# Altium PCB Power Board.PcbDoc
Units mil, origin at the board's own origin, x right, y up, seen from the top; angles counter-clockwise.
Board outline 3937.01 x 3937.01 mil, 2 copper layers (Top Layer, Bottom Layer); 90 components, 30 nets, 264 pads, 270 vias.
Unrouted connection lines stored in the file: 23.
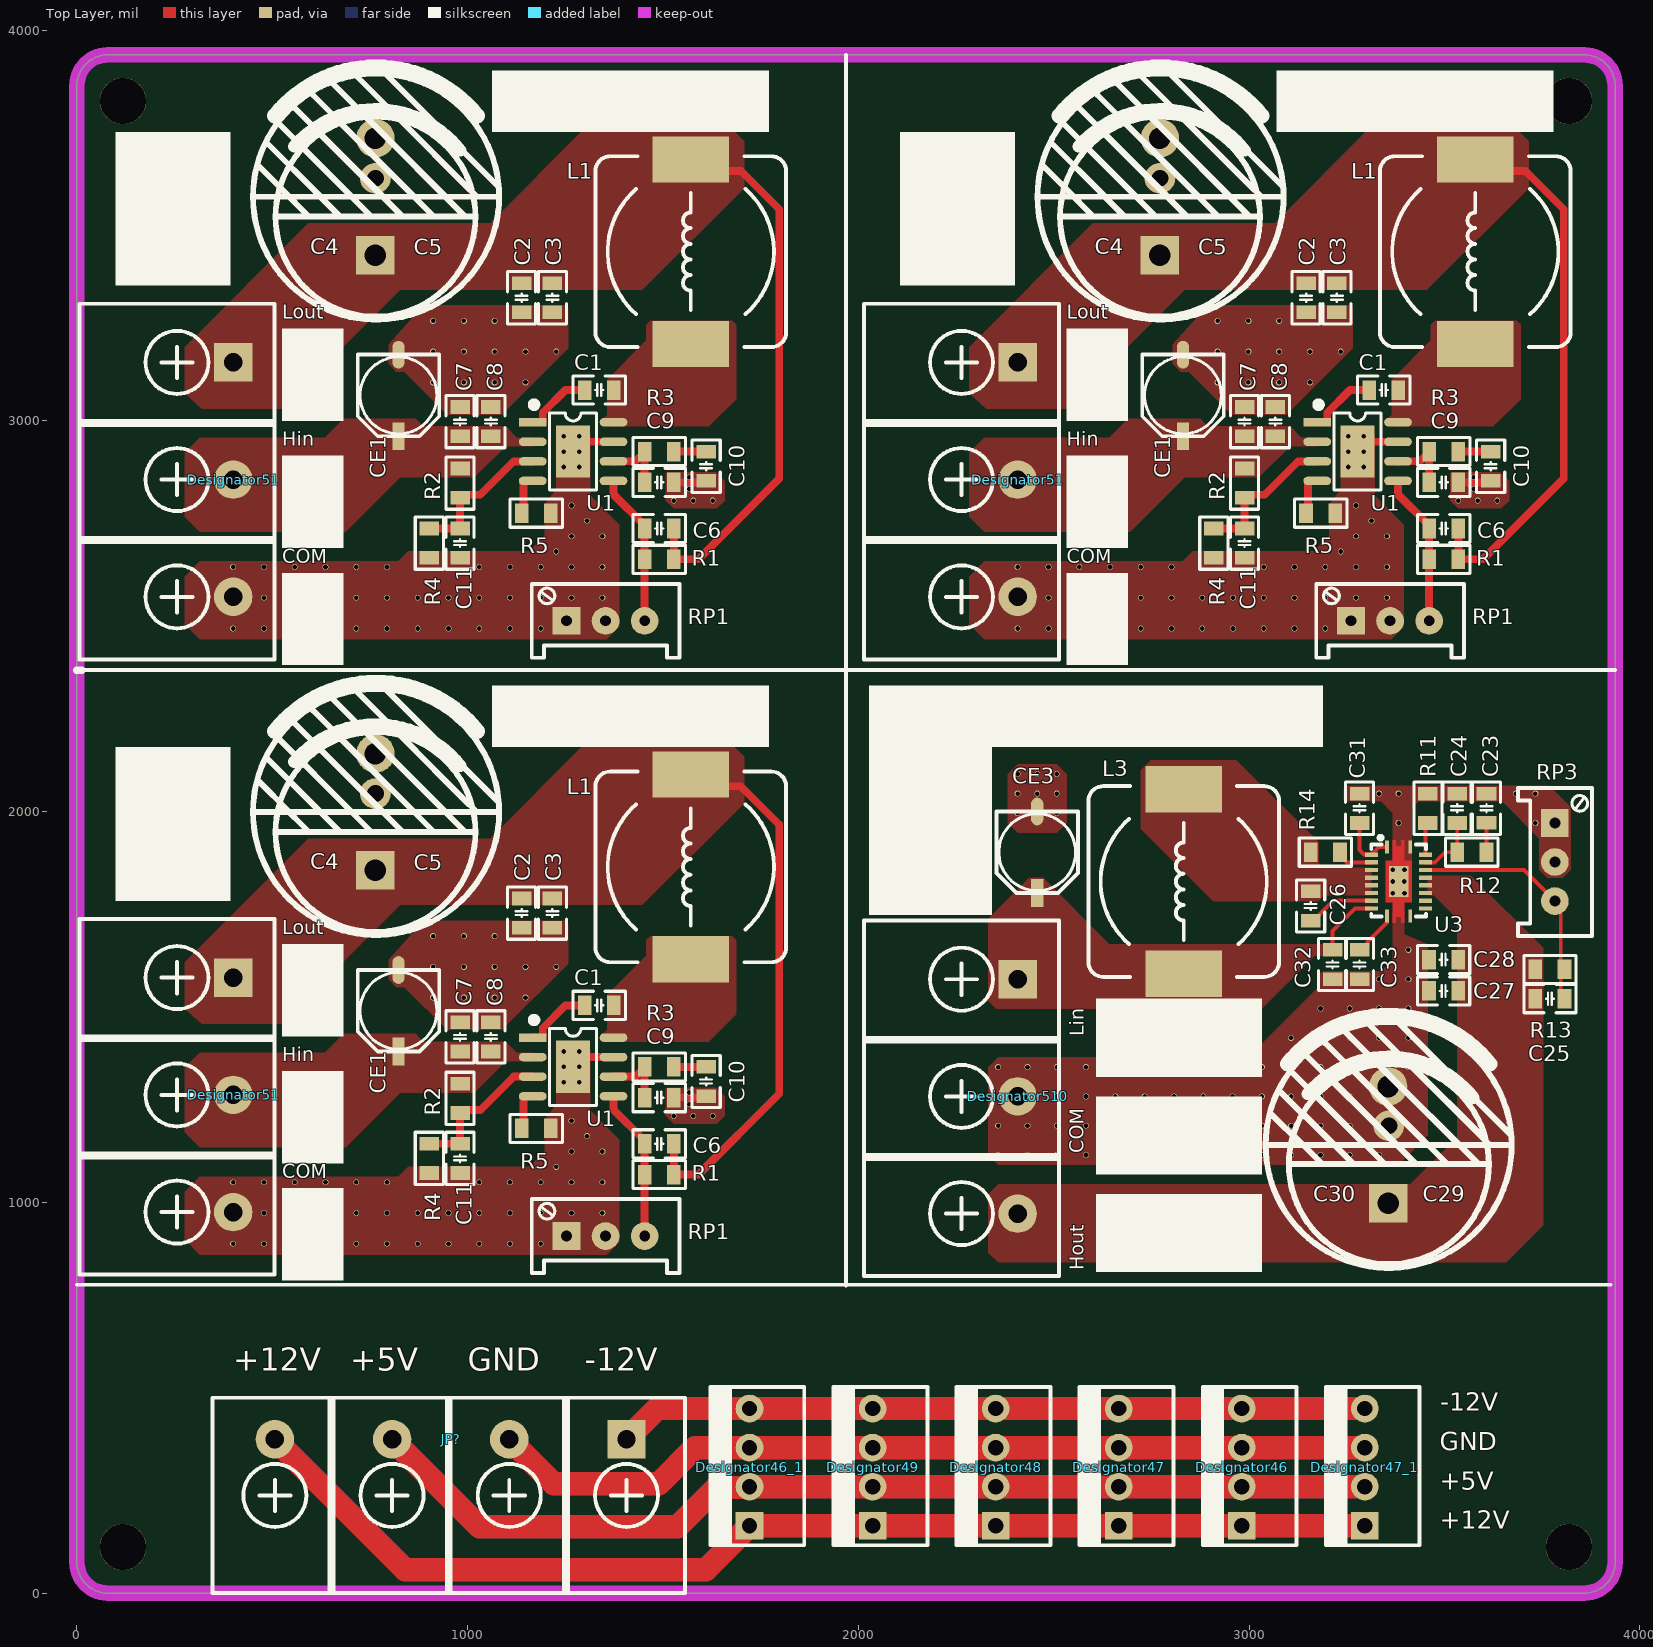
[diagram p0: Top Layer view]
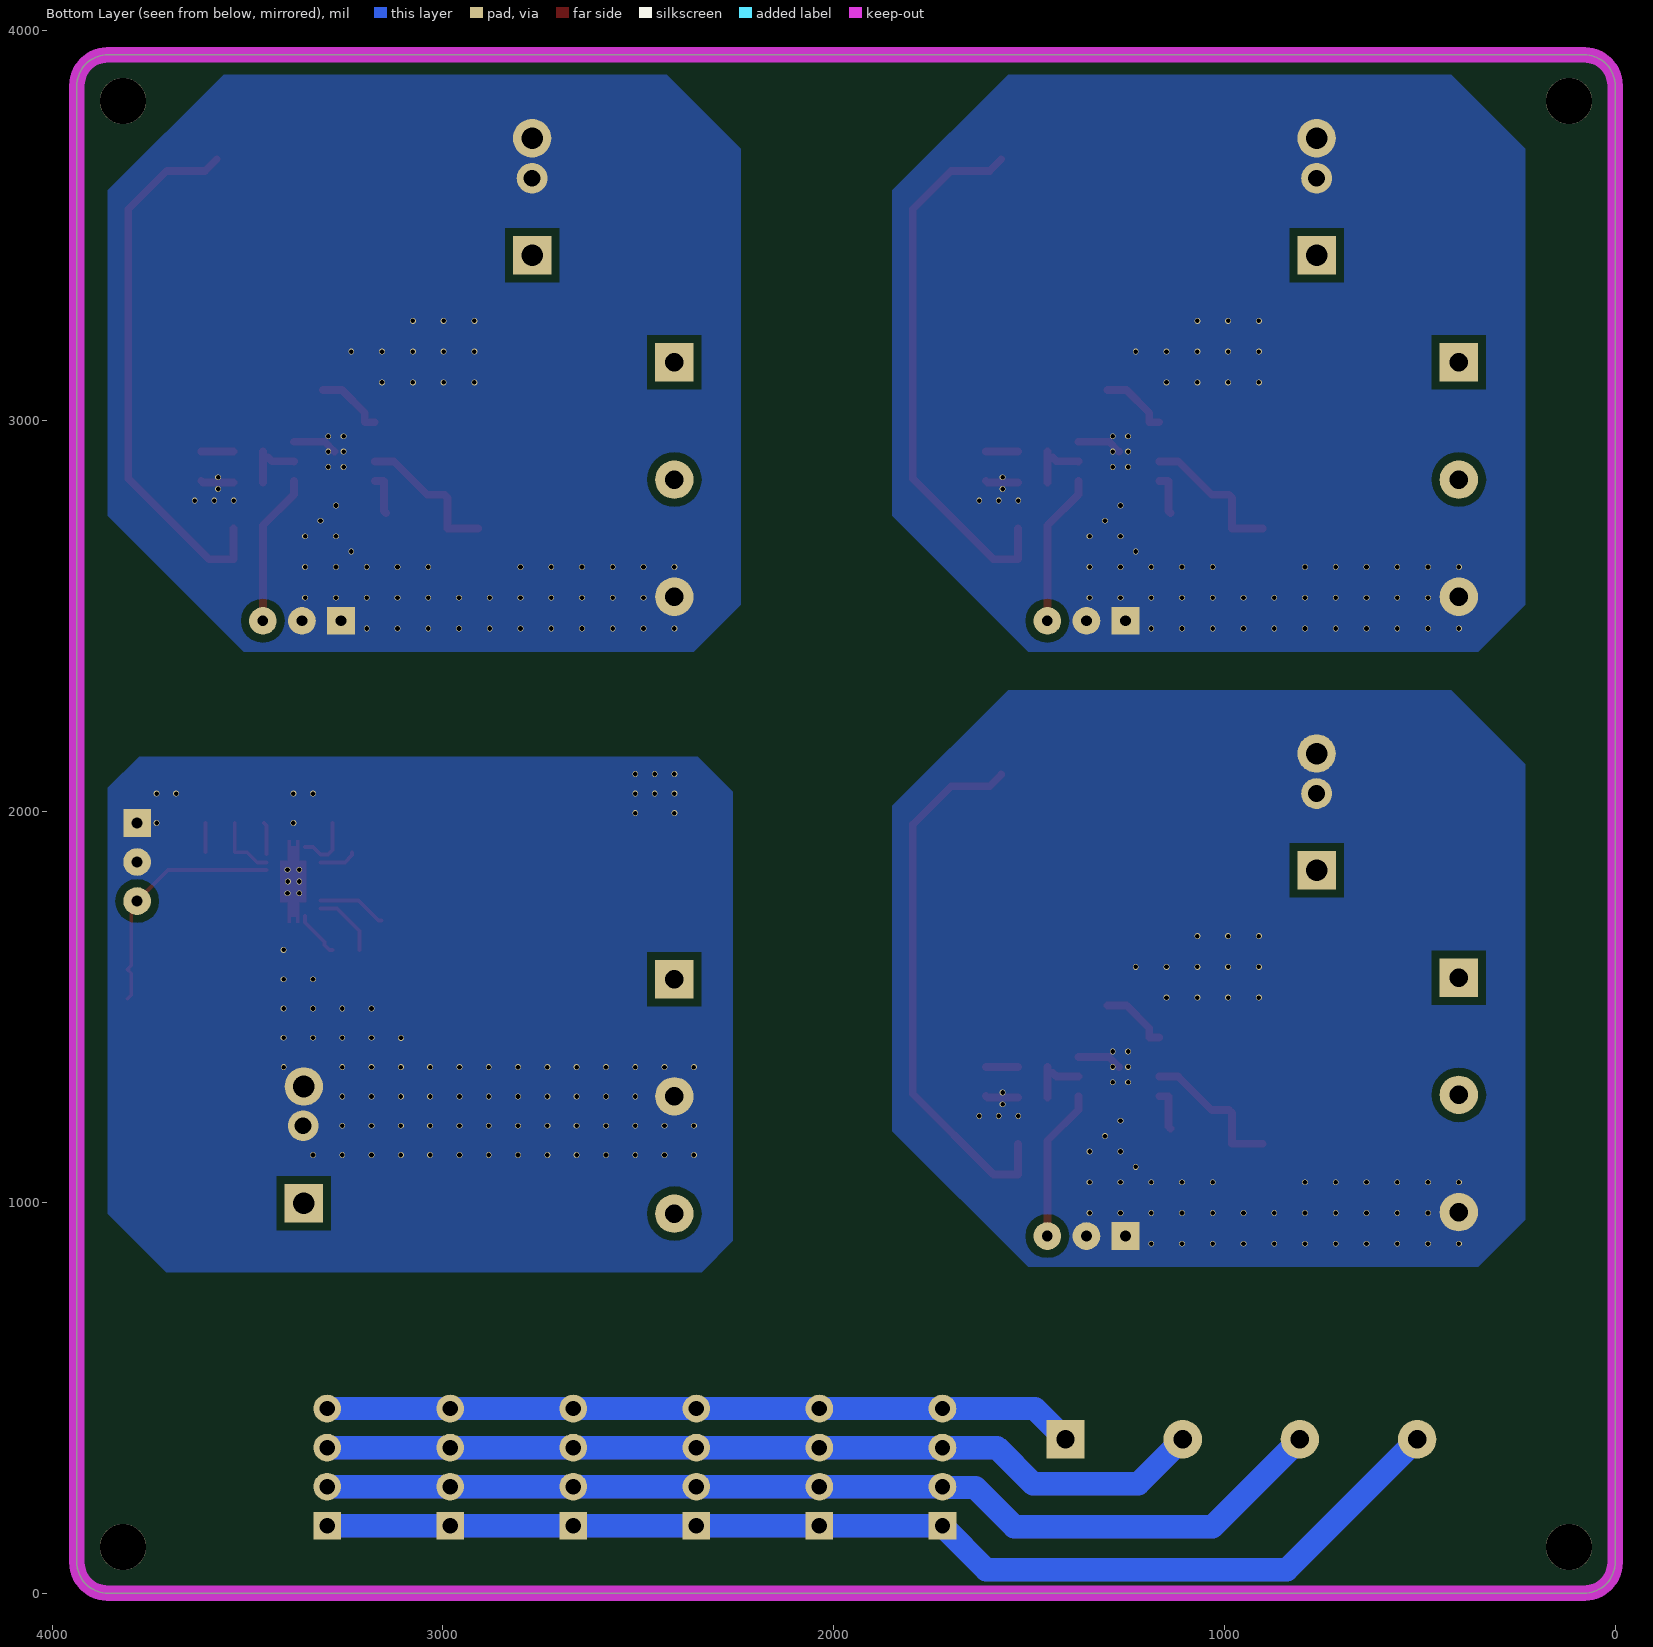
[diagram p1: Bottom Layer view, seen from below]

## Layer stack, top to bottom
Top Solder: solder mask 0.4, Solder Resist, Dk 3.5
Top Layer: signal copper 1.4
Dielectric 1: dielectric 12.6, FR-4, Dk 4.8
Bottom Layer: signal copper 1.4
Bottom Solder: solder mask 0.4, Solder Resist, Dk 3.5

## Board outline
0,78.74 0,3858.27 cw(c78.74,3858.27) 78.74,3937.01 3858.27,3937.01 cw(c3858.27,3858.27) 3937.01,3858.27 3937.01,78.74 cw(c3858.27,78.74) 3858.27,0 78.74,0 cw(c78.74,78.74)

## Design rules (kind name [scope] priority, off if disabled: settings)
Clearance Clearance_1 [OnLayer('Bottom Layer')] p1: gap=20 ignorepadtopadclearanceinfootprint=TRUE except(0: Arc-Hole Track-Hole SMDPad-Hole THPad-Hole Via-Hole Fill-Hole Poly-Hole Region-Hole Text-Hole; 10: Arc-Arc Arc-Track Arc-SMDPad Arc-THPad Arc-Via Arc-Text Track-Track Track-SMDPad Track-THPad Track-Via Track-Text SMDPad-SMDPad SMDPad-THPad SMDPad-Via SMDPad-Text THPad-THPad THPad-Via THPad-Text Via-Via Via-Text Text-Text)
Clearance [All] p2: gap=5 ignorepadtopadclearanceinfootprint=FALSE except(0: Arc-Hole Track-Hole SMDPad-Hole THPad-Hole Via-Hole Fill-Hole Poly-Hole Region-Hole Text-Hole; 10: Arc-Arc Arc-Track Arc-SMDPad Arc-THPad Arc-Via Arc-Text Track-Track Track-SMDPad Track-THPad Track-Via Track-Text SMDPad-SMDPad SMDPad-THPad SMDPad-Via SMDPad-Text THPad-THPad THPad-Via THPad-Text Via-Via Via-Text Text-Text)
PolygonConnect [All] p1: connectstyle=Direct reliefconductorwidth=10 reliefentries=4 polygonreliefangle="90 Angle" airgapwidth=10
RoutingVias [All] p1: holewidth=28 width=50 viastyle="Through Hole" minholewidth=28 minwidth=50 maxholewidth=28 maxwidth=50
SolderMaskExpansion [All] p1: expansion=4 istentingtop=FALSE
Width [All] p1: maxlimit=80 minlimit=10 preferedwidth=10
30 further rules are at their usual default settings.

## Classes and differential pairs
component class "SCT12A0 BOOST": C23 C24 C25 C26 C27 C28 C29 C30 C31 C32 C33 CE3 L3 R11 R12 R13 R14 RP3 U3

## Components (designator, comment, footprint, x,y, rotation, side; value= is the part's Value field where it differs from the comment)
C1 "104" "C 0805_L" 1337.01,1504.33 r0 top
C1 "104" "C 0805_L" 3344.89,3079.14 r0 top
C1 "104" "C 0805_L" 1337.01,3079.14 r0 top
C2 "105" "C 0805_L" 1138.19,1740.55 r90 top
C2 "105" "C 0805_L" 3146.06,3315.35 r90 top
C2 "105" "C 0805_L" 1138.19,3315.35 r90 top
C3 "104" "C 0805_L" 1216.93,1740.55 r90 top
C3 "104" "C 0805_L" 3224.8,3315.35 r90 top
C3 "104" "C 0805_L" 1216.93,3315.35 r90 top
C4 "1000uF" "CAP 7.5*16*25" 765.67,1999.29 r90 top
C4 "1000uF" "CAP 7.5*16*25" 2773.55,3574.09 r90 top
C4 "1000uF" "CAP 7.5*16*25" 765.67,3574.09 r90 top
C5 "1000uF" "CAP 5.0*12.5*20" 764.17,1948.11 r90 top
C5 "1000uF" "CAP 5.0*12.5*20" 2772.05,3522.91 r90 top
C5 "1000uF" "CAP 5.0*12.5*20" 764.17,3522.91 r90 top
C6 "20" "C 0805_L" 1490.55,1150 r0 top
C6 "20" "C 0805_L" 3498.43,2724.81 r0 top
C6 "20" "C 0805_L" 1490.55,2724.81 r0 top
C7 "104" "C 0805_L" 980.71,1423.62 r270 top
C7 "104" "C 0805_L" 2988.59,2998.42 r270 top
C7 "104" "C 0805_L" 980.71,2998.42 r270 top
C8 "475" "C 0805_L" 1059.45,1423.62 r270 top
C8 "475" "C 0805_L" 3067.33,2998.42 r270 top
C8 "475" "C 0805_L" 1059.45,2998.42 r270 top
C9 "20" "C 0805_L" 1490.55,1268.11 r180 top
C9 "20" "C 0805_L" 3498.42,2842.91 r180 top
C9 "20" "C 0805_L" 1490.55,2842.91 r180 top
C10 "272" "C 0805_L" 1610.63,1309.45 r90 top
C10 "272" "C 0805_L" 3618.5,2884.26 r90 top
C10 "272" "C 0805_L" 1610.63,2884.26 r90 top
C11 "103" "C 0805_L" 980.71,1112.6 r90 top
C11 "103" "C 0805_L" 2988.58,2687.4 r90 top
C11 "103" "C 0805_L" 980.71,2687.4 r90 top
C23 "472" "C 0805_L" 3607.88,2008.86 r270 top
C24 "47" "C 0805_L" 3532.88,2008.66 r270 top
C25 "20" "C 0805_L" 3770.27,1521.26 r180 top
C26 "514" "C 0805_L" 3157.87,1758.66 r90 top
C27 "105" "C 0805_L" 3497.87,1541.26 r0 top
C28 "104" "C 0805_L" 3497.87,1621.26 r0 top
C29 "1000uF" "CAP 7.5*16*25" 3357.48,1147.05 r90 top
C30 "1000uF" "CAP 5.0*12.5*20" 3357.87,1097.84 r90 top
C31 "105" "C 0805_L" 3282.88,2008.66 r270 top
C32 "104" "C 0805_L" 3213.87,1608.86 r90 top
C33 "473" "C 0805_L" 3282.87,1608.86 r90 top
CE1 "47uF 50V" "CM C(5*5.4)" 823.23,1490.55 r270 top
CE1 "47uF 50V" "CM C(5*5.4)" 2831.1,3065.35 r270 top
CE1 "47uF 50V" "CM C(5*5.4)" 823.23,3065.35 r270 top
CE3 "47uF 50V" "CM C(5*5.4)" 2457.87,1896.26 r270 top
Designator46 "Comment" KF2510-LI-4P 2981.5,322.44 r90 top
Designator46_1 "Comment" KF2510-LI-4P 1721.65,322.44 r90 top
Designator47 "Comment" KF2510-LI-4P 2666.54,322.44 r90 top
Designator47_1 "Comment" KF2510-LI-4P 3296.46,322.44 r90 top
Designator48 "Comment" KF2510-LI-4P 2351.57,322.44 r90 top
Designator49 "Comment" KF2510-LI-4P 2036.61,322.44 r90 top
Designator51 "Comment" KF7620-3P 256.3,1275.2 r270 top
Designator51 "Comment" KF7620-3P 2264.17,2850 r270 top
Designator51 "Comment" KF7620-3P 256.3,2850 r270 top
Designator510 "Comment" KF7620-3P 2264.17,1271.26 r270 top
JP? "HDR-1X4" KF7620-4P 956.69,250 r180 top
L1 "10uH" CDRH127 1571.26,1858.66 r90 top
L1 "10uH" CDRH127 3579.13,3433.46 r90 top
L1 "10uH" CDRH127 1571.26,3433.46 r90 top
L3 "4.7uH" CDRH127 2832.87,1821.26 r90 top
R1 "68K" "R 0805_L" 1490.55,1071.26 r0 top
R1 "68K" "R 0805_L" 3498.43,2646.07 r0 top
R1 "68K" "R 0805_L" 1490.55,2646.07 r0 top
R2 "200K" "R 0805_L" 980.71,1266.14 r90 top
R2 "200K" "R 0805_L" 2988.58,2840.95 r90 top
R2 "200K" "R 0805_L" 980.71,2840.95 r90 top
R3 "47K" "R 0805_L" 1490.55,1346.85 r180 top
R3 "47K" "R 0805_L" 3498.42,2921.65 r180 top
R3 "47K" "R 0805_L" 1490.55,2921.65 r180 top
R4 "100K" "R 0805_L" 901.97,1112.6 r90 top
R4 "100K" "R 0805_L" 2909.84,2687.4 r90 top
R4 "100K" "R 0805_L" 901.97,2687.4 r90 top
R5 "200K" "R 0805_L" 1175.59,1189.37 r180 top
R5 "200K" "R 0805_L" 3183.46,2764.17 r180 top
R5 "200K" "R 0805_L" 1175.59,2764.17 r180 top
R11 "150K" "R 0805_L" 3457.88,2008.66 r270 top
R12 "18K" "R 0805_L" 3570.27,1896.26 r180 top
R13 "47K" "R 0805_L" 3770.27,1596.26 r180 top
R14 "300K" "R 0805_L" 3195.48,1896.26 r0 top
RP1 "203" 3296W 1353.15,913.78 r0 top
RP1 "203" 3296W 3361.02,2488.58 r0 top
RP1 "203" 3296W 1353.15,2488.58 r0 top
RP3 "203" 3296W 3782.87,1871.26 r270 top
U1 "SCT2430" ESOP8_N 1270.08,1346.85 r0 top
U1 "SCT2430" ESOP8_N 3277.95,2921.65 r0 top
U1 "SCT2430" ESOP8_N 1270.08,2921.65 r0 top
U3 "SCT12A0" "DFN-20L (3.5x4.5)" 3382.87,1821.26 r270 top

## Footprints (in the part's own frame and the unit in brackets; to place one, negate y for a bottom-side part, rotate by r counter-clockwise, add the part's x,y. Pads: shape width x height; smd on the part's side, far side on the other; paste and mask are expansions set on the pad)
3296W [mm] "Precise Multi-Winding Adjustable Resistor"
  rect 1.8x1.8 hole 0.7: 1(-2.54,0)
  round 1.8 hole 0.7: 2(0,0) 3(2.54,0)
  silkscreen extent -4.8,-2.4 4.8,2.4, body extent -4.75,-2.4 4.75,2.4, height 11.52
"C 0805_L" [mil] "无极性贴片电容"
  rect 35x50 smd: 1(-37.4,0) 2(37.4,0)
  silkscreen extent -67,-36 67,36, body extent -39,-24 39,24, height 20
"CAP 5.0*12.5*20" [mm] "脚距5mm直径12.5mm高度20mm"
  rect 2x2 hole 1.1: 1(-2.5,0)
  round 2 hole 1.1: 2(2.5,0)
  silkscreen extent -6.5,-6.5 6.99,6.5, body extent -6.25,-6.25 6.26,6.25, height 20.03
"CAP 7.5*16*25" [mm] "脚距7.5mm直径16mm高度25mm"
  rect 2.5x2.5 hole 1.4: 1(-3.8,0.038)
  round 2.5 hole 1.4: 2(3.8,0.038)
  silkscreen extent -8,-8 8.42,8, body extent -8,-8 8.01,8, height 25.03
CDRH127 [mm] "12*12*8mm（长宽高）"
  rect 3x5 smd: 1(-6,0) 2(6,0)
  silkscreen extent -6.2,-6.2 6.2,6.2, body extent -6,-6 6,6, height 7.8
"CM C(5*5.4)" [mm] "贴片电解电容，直径5mm，高5.4mm"
  rect 1.8x0.8 smd: 1(2.65,0)
  oval 1.8x0.8 smd: 2(-2.65,0)
  silkscreen extent -2.65,-2.65 2.65,2.65, body extent -2.95,-2.65 2.95,2.65, height 5.4
"DFN-20L (3.5x4.5)" [mm]
  rect 0.85x0.24 smd: 1(-2.25,-0.752) 10(2.25,-0.752) 11(2.25,0.748) 20(-2.25,0.75)
  rect 0.28x0.85 smd: 2(-1.749,-1.75) 3(-1.248,-1.75) 4(-0.749,-1.75) 5(-0.248,-1.75) 6(0.251,-1.75) 7(0.752,-1.75) 8(1.251,-1.75) 9(1.752,-1.75) 12(1.752,1.75) 13(1.251,1.75) 14(0.75,1.748) 15(0.25,1.748) 16(-0.25,1.748) 17(-0.75,1.748) 18(-1.25,1.748) 19(-1.75,1.748)
  rect 2.032x1.27 smd: 21(0,0)
  Top Layer region: -2.68,0.38 -2.68,0.39 -2.68,0.38 -1.35,0.38 -1.35,0.85 1.35,0.85 1.35,0.38 2.67,0.38 2.67,0.18 2.28,0.18 2.28,-0.18 2.67,-0.18 2.67,-0.38 1.35,-0.38 1.35,-0.85 -1.35,-0.85 -1.35,-0.38 -2.67,-0.38 -2.67,-0.18 -2.28,-0.18 -2.28,0.01 -2.28,0.18 -2.68,0.18
  silkscreen extent -2.98,-1.78 2.29,1.78
ESOP8_N [mm] "5*6*1.8mm（长宽高）"
  rect 1.8x0.55 smd: 1(-2.625,1.905)
  oval 1.8x0.55 smd: 2(-2.625,0.635) 3(-2.625,-0.635) 4(-2.625,-1.905) 5(2.625,-1.905) 6(2.625,-0.635) 7(2.625,0.635) 8(2.625,1.905)
  rect 2.2x3.4 smd paste-2: 9(0,0)
  rect 0.9x0.7 on Top Paste: 10(-0.625,-1.1) 10(-0.625,0) 10(-0.625,1.1) 11(0.65,-1.1) 11(0.65,0) 11(0.65,1.1)
  silkscreen extent -2.69,-2.5 1.52,3.2, body extent -3,-2.5 3,2.5, height 1.53
KF2510-LI-4P [mm] "接插件/2A"
  rect 1.8x1.8 hole 1: 1(-3.81,0)
  round 1.8 hole 1: 2(-1.27,0) 3(1.27,0) 4(3.81,0)
  silkscreen extent -5.08,-3.56 5.21,2.54, body extent -5.08,-3.5 5.08,2.4, height 11.05
KF7620-3P [mm] "22.8*12*12mm(长宽高)"
  rect 2.5x2.5 hole 1.2: 1(-7.62,3.65)
  round 2.5 hole 1.2: 2(0,3.65) 3(7.62,3.65)
  silkscreen extent -11.43,-6.35 11.68,6.35, body extent -12.13,-6.2 11.43,6.2, height 12.45
KF7620-4P [mm] "30.5*12*12mm(长宽高)"
  rect 2.5x2.5 hole 1.2: 1(-11.43,-3.65)
  round 2.5 hole 1.2: 2(-3.81,-3.65) 3(3.81,-3.65) 4(11.43,-3.65)
  silkscreen extent -15.24,-6.35 15.49,6.35, body extent -15.24,-6.2 15.94,6.2, height 12.45
"R 0805_L" [mil] "1/8W贴片电阻   https://item.taobao.com/item.htm?ft=t&id=613637044352"
  rect 35x50 smd: 1(-37.4,0) 2(37.4,0)
  silkscreen extent -67,-36 67,36, body extent -39,-25 39,25, height 20

## Part data
C1 C1 C1 C2 C2 C2 C3 C3 C3 C6 C6 C6 C7 C7 C7 C8 C8 C8 C9 C9 C9 C10 C10 C10 C11 C11 C11 C23 C24 C25 C26 C27 C28 C31 C32 C33: library part C, "贴片电容", BOM名称=贴片电容, 下单链接=https://item.taobao.com/item.htm?ft=t&id=613637044352, 淘宝ID=小糖豆的小窝窝
C4 C4 C4 C5 C5 C5 C29 C30: library part CE, "直插电解电容", BOM名称=直插电解电容, 下单链接=https://item.taobao.com/item.htm?ft=t&id=613637044352, 淘宝ID=小糖豆的小窝窝
CE1 CE1 CE1 CE3: library part CE_SMD, "贴片电解电容", BOM名称=贴片电解电容, 下单链接=https://item.taobao.com/item.htm?ft=t&id=613637044352, 淘宝ID=小糖豆的小窝窝
JP?: library part "Header 4", "4P接插件", BOM名称=4P接插件, 下单链接=https://item.taobao.com/item.htm?ft=t&id=613637044352, 淘宝ID=小糖豆的小窝窝
L1 L1 L1 L3: library part L-CDRH, "功率屏蔽电感", BOM名称=功率屏蔽电感, 下单链接=https://item.taobao.com/item.htm?ft=t&id=613637044352, 淘宝ID=小糖豆的小窝窝
R1 R1 R1 R2 R2 R2 R3 R3 R3 R4 R4 R4 R5 R5 R5 R11 R12 R13 R14: library part R, "贴片电阻", BOM名称=贴片电阻, 下单链接=https://item.taobao.com/item.htm?ft=t&id=613637044352, 淘宝ID=小糖豆的小窝窝
RP1 RP1 RP1 RP3: library part RP, "单联电位器", BOM名称=单联电位器, 下单链接=https://item.taobao.com/item.htm?ft=t&id=613637044352, 淘宝ID=小糖豆的小窝窝

## Free pads (board coordinates)
  round 118.11 hole 118.11: Q(118.11,118.11) Q(118.11,3818.9) Q(3818.9,118.11) Q(3818.9,3818.9)

## Via types
v1: diameter 15, hole 12, Top Layer to Bottom Layer, tented both sides, 270 vias

## Nets (pads, with @x,y where several pads share a name; then routed paths per layer and width w, separated by ;. In a path a pad name is that pad's centre, name@x,y a point inside that pad or via, vN(x,y) a via of type N, cw(c..) or ccw(c..) an arc to the next point about the centre after c; other vN are vias at no path point)
1: Designator46.4 Designator46_1.4 Designator47.4 Designator47_1.4 Designator48.4 Designator49.4 JP?.1 | length 3844.8
  Top Layer w60: JP?.1 1485.43,472.44 Designator46_1.4 Designator49.4 Designator48.4 Designator47.4 Designator46.4 Designator47_1.4
  Bottom Layer w60: JP?.1 1485.43,472.44 Designator46_1.4 Designator49.4 Designator48.4 Designator47.4 Designator46.4 Designator47_1.4
2: Designator46.3 Designator46_1.3 Designator47.3 Designator47_1.3 Designator48.3 Designator49.3 JP?.2 | length 4550.3
  Top Layer w60: JP?.2 1220.39,280 1489.84,280 1582.28,372.44 Designator46_1.3 Designator49.3 Designator48.3 Designator47.3 Designator46.3 Designator47_1.3
  Bottom Layer w60: JP?.2 1220.39,280 1489.84,280 1582.28,372.44 Designator46_1.3 Designator49.3 Designator48.3 Designator47.3 Designator46.3 Designator47_1.3
3: Designator46.2 Designator46_1.2 Designator47.2 Designator47_1.2 Designator48.2 Designator49.2 JP?.3 | length 5249.7
  Top Layer w60: JP?.3 1030.39,170 1537.32,170 1637.68,270.36 1719.57,270.36 Designator46_1.2 Designator49.2 Designator48.2 Designator47.2 Designator46.2 Designator47_1.2
  Bottom Layer w60: JP?.3 1030.39,170 1537.32,170 1637.68,270.36 1719.57,270.36 Designator46_1.2 Designator49.2 Designator48.2 Designator47.2 Designator46.2 Designator47_1.2
4: Designator46.1 Designator46_1.1 Designator47.1 Designator47_1.1 Designator48.1 Designator49.1 JP?.4 | length 5949.1
  Top Layer w60: JP?.4 840.39,60 1609.21,60 Designator46_1.1 Designator49.1 Designator48.1 Designator47.1 Designator46.1 Designator47_1.1
  Bottom Layer w60: JP?.4 840.39,60 1609.21,60 Designator46_1.1 Designator49.1 Designator48.1 Designator47.1 Designator46.1 Designator47_1.1
GND: C2.1 C3.1 C4.2 C5.2 C7.1 C8.1 C9.1 C10.1 C11.1 C23.1 C24.1 C27.1 C28.1 C29.2 C30.2 C31.1 C32.1 C33.1 CE1.2 CE3.2 Designator51.3 Designator510.2 R4.1 R5.1 R11.1 RP1.1 RP1.2 RP3.1 RP3.2 U1.7 U1.9 U3.20 U3.21 | length 594
  Top Layer w20: U1.9@1270.08,1346.85 1295.08,1371.85 U1.7@1373.43,1371.85 ; U1.9@1270.08,2921.65 1295.08,2946.65 U1.7@1373.43,2946.65 ; C9.1@1527.95,1268.11 1606.69,1268.11 C10.1@1610.63,1272.05 ; C9.1@1527.95,2842.91 1606.69,2842.91 C10.1@1610.63,2846.85 ; U1.9@3277.95,2921.65 3302.95,2946.65 U1.7@3381.3,2946.65 ; C9.1@3535.83,2842.91 3614.57,2842.91 C10.1@3618.5,2846.85
  other v1: 400,894.09 478.74,894.09 557.48,894.09 636.22,894.09 714.96,894.09 793.7,894.09 872.44,894.09 951.18,894.09 1029.92,894.09 1108.66,894.09 1187.4,894.09 478.74,972.83 557.48,972.83 636.22,972.83 714.96,972.83 793.7,972.83 872.44,972.83 951.18,972.83 1029.92,972.83 1108.66,972.83 1187.4,972.83 1266.14,972.83 1344.88,972.83 400,1051.57 478.74,1051.57 557.48,1051.57 636.22,1051.57 714.96,1051.57 793.7,1051.57 1029.92,1051.57 1108.66,1051.57 1187.4,1051.57 1266.14,1051.57 1344.88,1051.57 1226.77,1090.94 2357.87,1121.26 2432.87,1121.26 2507.87,1121.26 2582.87,1121.26 2657.87,1121.26 2732.87,1121.26 2807.87,1121.26 2882.87,1121.26 2957.87,1121.26 3032.87,1121.26 3107.87,1121.26 3182.87,1121.26 3257.87,1121.26 3332.87,1121.26 1266.14,1130.31 1344.88,1130.31 1305.51,1169.68 2357.87,1196.26 2432.87,1196.26 2507.87,1196.26 2582.87,1196.26 2657.87,1196.26 2732.87,1196.26 2807.87,1196.26 2882.87,1196.26 2957.87,1196.26 3032.87,1196.26 3107.87,1196.26 3182.87,1196.26 3257.87,1196.26 1266.14,1209.05 1527.56,1221.26 1577.56,1221.26 1627.56,1221.26 1567.56,1251.26 2507.87,1271.26 2582.87,1271.26 2657.87,1271.26 2732.87,1271.26 2807.87,1271.26 2882.87,1271.26 2957.87,1271.26 3032.87,1271.26 3107.87,1271.26 3182.87,1271.26 3257.87,1271.26 1567.56,1281.26 1246.46,1307.48 1285.83,1307.48 2357.87,1346.26 2432.87,1346.26 2507.87,1346.26 2582.87,1346.26 2657.87,1346.26 2732.87,1346.26 2807.87,1346.26 2882.87,1346.26 2957.87,1346.26 3032.87,1346.26 3107.87,1346.26 3182.87,1346.26 3257.87,1346.26 3407.54,1346.23 1246.46,1346.85 1285.83,1346.85 1246.46,1386.22 1285.83,1386.22 3107.54,1421.23 3182.87,1421.26 3257.87,1421.26 3332.87,1421.26 3407.87,1421.26 3182.87,1496.26 3257.87,1496.26 3332.87,1496.26 3407.87,1496.26 911.81,1524.02 990.55,1524.02 1069.29,1524.02 1148.03,1524.02 3332.87,1571.26 3407.87,1571.26 911.81,1602.76 990.55,1602.76 1069.29,1602.76 1148.03,1602.76 1226.77,1602.76 3407.87,1646.26 911.81,1681.5 990.55,1681.5 1069.29,1681.5 3367.87,1791.26 3397.87,1791.26 3367.91,1821.22 3397.11,1821.26 3367.87,1851.26 3397.87,1851.26 3382.87,1971.26 3732.87,1971.26 2407.87,1996.26 2507.87,1996.26 2407.87,2046.26 2457.87,2046.26 2507.87,2046.26 3332.87,2046.26 3382.87,2046.26 3682.87,2046.26 3732.87,2046.26 2407.87,2096.26 2457.87,2096.26 2507.87,2096.26 400,2468.9 478.74,2468.9 557.48,2468.9 636.22,2468.9 714.96,2468.9 793.7,2468.9 872.44,2468.9 951.18,2468.9 1029.92,2468.9 1108.66,2468.9 1187.4,2468.9 2407.87,2468.9 2486.61,2468.9 2565.35,2468.9 2644.09,2468.9 2722.83,2468.9 2801.57,2468.9 2880.32,2468.9 2959.06,2468.9 3037.8,2468.9 3116.54,2468.9 3195.28,2468.9 478.74,2547.64 557.48,2547.64 636.22,2547.64 714.96,2547.64 793.7,2547.64 872.44,2547.64 951.18,2547.64 1029.92,2547.64 1108.66,2547.64 1187.4,2547.64 1266.14,2547.64 1344.88,2547.64 2486.61,2547.64 2565.35,2547.64 2644.09,2547.64 2722.83,2547.64 2801.57,2547.64 2880.32,2547.64 2959.06,2547.64 3037.8,2547.64 3116.54,2547.64 3195.28,2547.64 3274.02,2547.64 3352.76,2547.64 400,2626.38 478.74,2626.38 557.48,2626.38 636.22,2626.38 714.96,2626.38 793.7,2626.38 1029.92,2626.38 1108.66,2626.38 1187.4,2626.38 1266.14,2626.38 1344.88,2626.38 2407.87,2626.38 2486.61,2626.38 2565.35,2626.38 2644.09,2626.38 2722.83,2626.38 2801.57,2626.38 3037.8,2626.38 3116.54,2626.38 3195.28,2626.38 3274.02,2626.38 3352.76,2626.38 1226.77,2665.75 3234.65,2665.75 1266.14,2705.12 1344.88,2705.12 3274.02,2705.12 3352.76,2705.12 1305.51,2744.49 3313.39,2744.49 1266.14,2783.86 3274.02,2783.86 1527.56,2796.06 1577.56,2796.06 1627.56,2796.06 3535.43,2796.06 3585.43,2796.06 3635.43,2796.06 1567.56,2826.06 3575.43,2826.06 1567.56,2856.06 3575.43,2856.06 1246.46,2882.28 1285.83,2882.28 3254.33,2882.28 3293.7,2882.28 1246.46,2921.65 1285.83,2921.65 3254.33,2921.65 3293.7,2921.65 1246.46,2961.02 1285.83,2961.02 3254.33,2961.02 3293.7,2961.02 911.81,3098.82 990.55,3098.82 1069.29,3098.82 1148.03,3098.82 2919.69,3098.82 2998.43,3098.82 3077.17,3098.82 3155.91,3098.82 911.81,3177.56 990.55,3177.56 1069.29,3177.56 1148.03,3177.56 1226.77,3177.56 2919.69,3177.56 2998.43,3177.56 3077.17,3177.56 3155.91,3177.56 3234.65,3177.56 911.81,3256.3 990.55,3256.3 1069.29,3256.3 2919.69,3256.3 2998.43,3256.3 3077.17,3256.3
IN: C7.2 C8.2 C32.2 CE1.1 CE3.1 Designator51.2 Designator510.1 L3.1 R2.2 U1.2 U3.9 | length 172.4
  Top Layer w10: C32.2 3213.87,1694.76 3271.41,1752.3 U3.9
NetC1_1: C1.1 U1.1 | length 541.9
  Top Layer w20: U1.1@1166.73,1421.85 1191.34,1421.85 1192.17,1422.68 1192.17,1445.87 1250.63,1504.33 C1.1@1299.61,1504.33 ; U1.1@1166.73,2996.65 1191.34,2996.65 1192.17,2997.48 1192.17,3020.67 1250.63,3079.13 C1.1@1299.61,3079.13 ; U1.1@3174.61,2996.65 3199.21,2996.65 3200.04,2997.48 3200.04,3020.67 3258.5,3079.13 C1.1@3307.48,3079.13
NetC1_2: C1.2 L1.1 U1.8
NetC6_1: C6.1 R1.1 RP1.3 U1.5 | length 1173.3
  Top Layer w20: U1.5@1373.43,1271.85 1373.43,1237.22 1453.15,1157.5 1453.15,1150 1453.15,1071.26 RP1.3@1453.15,913.78 ; U1.5@1373.43,2846.65 1373.43,2812.03 1453.15,2732.3 1453.15,2724.8 1453.15,2646.06 RP1.3@1453.15,2488.58 ; U1.5@3381.3,2846.65 3381.3,2812.03 3461.02,2732.3 3461.02,2724.8 3461.02,2646.06 RP1.3@3461.02,2488.58
NetC9_2: C9.2 R3.2 U1.6 | length 497.1
  Top Layer w20: U1.6@1373.43,1321.85 1373.74,1322.17 1429.79,1322.17 1439.47,1331.85 1445.65,1331.85 R3.2@1453.15,1339.35 ; U1.6@1373.43,2896.65 1373.74,2896.97 1429.79,2896.97 1439.47,2906.65 1445.65,2906.65 R3.2@1453.15,2914.15 ; C9.2@1453.15,1268.11 R3.2@1453.15,1339.35 ; R3.2@1453.15,1346.85 R3.2@1453.15,1339.35 ; C9.2@1453.15,2842.91 R3.2@1453.15,2914.15 ; R3.2@1453.15,2921.65 R3.2@1453.15,2914.15 ; U1.6@3381.3,2896.65 3381.62,2896.97 3437.66,2896.97 3447.34,2906.65 3453.52,2906.65 R3.2@3461.02,2914.15 ; C9.2@3461.02,2842.91 R3.2@3461.02,2914.15 ; R3.2@3461.02,2921.65 R3.2@3461.02,2914.15
NetC10_2: C10.2 R3.1 | length 248
  Top Layer w20: R3.1@1527.95,1346.85 C10.2@1610.63,1346.85 ; R3.1@1527.95,2921.65 C10.2@1610.63,2921.65 ; R3.1@3535.83,2921.65 C10.2@3618.5,2921.65
NetC11_2: C11.2 R2.1 R4.2 U1.3 | length 1146.2
  Top Layer w20: R4.2@901.97,1150 980.71,1150 980.71,1228.74 988.21,1236.24 1032.54,1236.24 1118.15,1321.85 U1.3@1166.73,1321.85 ; R4.2@901.97,2724.8 980.71,2724.8 980.71,2803.54 988.21,2811.04 1032.54,2811.04 1118.15,2896.65 U1.3@1166.73,2896.65 ; R4.2@2909.84,2724.8 2988.58,2724.8 2988.58,2803.54 2996.08,2811.04 3040.41,2811.04 3126.02,2896.65 U1.3@3174.61,2896.65
NetC12_1: 
NetC12_2: 
NetC17_1: 
NetC20_2: 
NetC21_2: 
NetC22_2: 
NetC23_2: C23.2 R12.1 | length 75.3
  Top Layer w10: R12.1 3607.87,1896.46 C23.2
NetC24_2: C24.2 R12.2 U3.18 | length 166.9
  Top Layer w10: U3.18 3475.46,1870.47 3501.25,1896.26 R12.2 C24.2
NetC25_1: C25.1 R13.1 RP3.3 U3.17 | length 631.3
  Top Layer w10: U3.17 3474.24,1850.79 ; 3475.46,1850.79 3703.34,1850.79 RP3.3 3782.87,1754.79 3797.87,1739.79 3797.87,1606.06 R13.1 3797.87,1586.46 3797.87,1531.06 C25.1
NetC26_1: C26.1 U3.8 | length 177.2
  Top Layer w10: C26.1 3165.37,1721.26 3216.37,1772.26 3263.09,1772.26 3263.13,1772.3 U3.8@3313.97,1772.3
NetC26_2: C26.2 L3.2 R14.1 U3.4 U3.5 U3.6 U3.7
NetC31_2: C31.2 U3.1 U3.2 | length 152.1
  Top Layer w10: C31.2 3282.87,1901.92 3293.87,1890.92 3313.97,1890.92 3332.89,1909.84 U3.1
NetC33_2: C33.2 U3.10 | length 119.8
  Top Layer w10: C33.2 3290.37,1646.26 3302.87,1658.76 3302.87,1666.26 3352.91,1716.3 U3.10@3352.91,1732.68
NetR5_2: R5.2 U1.4 | length 322.7
  Top Layer w20: R5.2@1138.19,1189.37 1143.34,1194.52 1143.34,1271.09 1144.1,1271.85 U1.4@1166.73,1271.85 ; R5.2@1138.19,2764.17 1143.34,2769.32 1143.34,2845.89 1144.1,2846.65 U1.4@1166.73,2846.65 ; R5.2@3146.06,2764.17 3151.21,2769.32 3151.21,2845.89 3151.97,2846.65 U1.4@3174.61,2846.65
NetR10_2: 
NetR11_2: R11.2 U3.19 | length 82.8
  Top Layer w10: U3.19@3451.69,1890.98 3451.69,1965.08 R11.2
NetR14_2: R14.2 U3.3 | length 96.2
  Top Layer w10: R14.2 3232.87,1888.76 3251.22,1870.41 U3.3
OUT: C2.2 C3.2 C4.1 C5.1 C6.2 C25.2 C27.2 C28.2 C29.1 C30.1 Designator51.1 Designator510.3 L1.2 R1.2 R13.2 U3.14 U3.15 U3.16 | length 4207.2
  Top Layer w20: C6.2@1527.95,1150 1527.95,1078.76 1527.95,1071.26 1590.94,1071.26 1797.64,1277.95 1797.64,1966.93 1699.21,2065.35 1600.79,2065.35 L1.2@1571.26,2094.88 ; C6.2@1527.95,2724.8 1527.95,2653.56 1527.95,2646.06 1590.94,2646.06 1797.64,2852.76 1797.64,3541.73 1699.21,3640.16 1600.79,3640.16 L1.2@1571.26,3669.68 ; C6.2@3535.83,2724.8 3535.83,2653.56 3535.83,2646.06 3598.82,2646.06 3805.51,2852.76 3805.51,3541.73 3707.09,3640.16 3608.66,3640.16 L1.2@3579.13,3669.68
pads on no net: U1.10 U1.11 U3.11 U3.12 U3.13

## Polygon pours and split planes (outlines as drawn)
GND on Top Layer "NONET_L02_P-001" (solid, remove dead copper, pour order 155): 1507.56,1291.26 1509.67,1293.37 1635.45,1293.37 1657.56,1271.26 1657.56,1221.26 1637.56,1201.26 1527.56,1201.26 1507.56,1221.26
GND on Top Layer "NONET_L02_P-001" (solid, remove dead copper, pour order 154): 1226.79,1250.23 1197.56,1211.26 1197.56,1131.26 1157.56,1091.26 847.56,1091.26 822.58,1066.28 314.96,1066.28 275.59,1026.91 275.59,905.51 314.96,866.14 1356.39,866.14 1388.71,898.45 1388.71,1160.11 1313.37,1235.44 1313.37,1391.26 1226.79,1391.26
OUT on Top Layer "NONET_L02_P-001" (solid, remove dead copper, pour order 153): 275.59,1496.06 275.59,1614.17 592.68,1931.26 1057.56,1931.26 1297.56,2171.26 1677.56,2171.26 1707.56,2141.26 1707.56,2021.26 1447.56,1761.26 827.56,1761.26 522.99,1456.69 320.21,1456.69
GND on Top Layer "NONET_L02_P-001" (solid, remove dead copper, pour order 152): 797.56,1621.26 797.56,1571.26 817.56,1551.26 837.56,1551.26 947.56,1441.26 1087.56,1441.26 1257.56,1611.26 1257.56,1711.26 1247.56,1721.26 887.56,1721.26
NetC1_2 on Top Layer "NONET_L02_P-001" (solid, remove dead copper, pour order 151): 1357.56,1531.26 1457.56,1631.26 1457.56,1671.26 1467.56,1681.26 1677.56,1681.26 1687.56,1671.26 1687.56,1481.26 1617.56,1411.26 1367.56,1411.26 1347.56,1431.26 1357.56,1441.26
IN on Top Layer "NONET_L02_P-001" (solid, remove dead copper, pour order 149): 872.44,1425.59 886.77,1411.26 1097.56,1411.26 1126.16,1382.66 1167.72,1382.66 1167.72,1361.02 1097.18,1360.88 1017.56,1281.26 827.56,1281.26 688.03,1141.73 314.02,1141.73 275.59,1180.16 275.59,1344.23 314.02,1382.66 634.63,1382.66 683.23,1431.26 866.77,1431.26
GND on Top Layer "NONET_L02_P-001" (solid, remove dead copper, pour order 147): 3515.43,2866.06 3517.54,2868.17 3643.33,2868.17 3665.43,2846.06 3665.43,2796.06 3645.43,2776.06 3535.43,2776.06 3515.43,2796.06
GND on Top Layer "NONET_L02_P-001" (solid, remove dead copper, pour order 146): 3234.66,2825.03 3205.43,2786.06 3205.43,2706.06 3165.43,2666.06 2855.43,2666.06 2830.45,2641.08 2322.83,2641.08 2283.46,2601.71 2283.46,2480.32 2322.83,2440.94 3364.27,2440.94 3396.58,2473.26 3396.58,2734.92 3321.25,2810.25 3321.25,2966.06 3234.66,2966.06
OUT on Top Layer "NONET_L02_P-001" (solid, remove dead copper, pour order 145): 2283.46,3070.87 2283.46,3188.98 2600.55,3506.06 3065.43,3506.06 3305.43,3746.06 3685.43,3746.06 3715.43,3716.06 3715.43,3596.06 3455.43,3336.06 2835.43,3336.06 2530.87,3031.5 2328.08,3031.5
GND on Top Layer "NONET_L02_P-001" (solid, remove dead copper, pour order 144): 2805.43,3196.06 2805.43,3146.06 2825.43,3126.06 2845.43,3126.06 2955.43,3016.06 3095.43,3016.06 3265.43,3186.06 3265.43,3286.06 3255.43,3296.06 2895.43,3296.06
NetC1_2 on Top Layer "NONET_L02_P-001" (solid, remove dead copper, pour order 143): 3365.43,3106.06 3465.43,3206.06 3465.43,3246.06 3475.43,3256.06 3685.43,3256.06 3695.43,3246.06 3695.43,3056.06 3625.43,2986.06 3375.43,2986.06 3355.43,3006.06 3365.43,3016.06
IN on Top Layer "NONET_L02_P-001" (solid, remove dead copper, pour order 141): 2880.32,3000.39 2894.65,2986.06 3105.43,2986.06 3134.03,2957.47 3175.59,2957.47 3175.59,2935.82 3105.06,2935.69 3025.43,2856.06 2835.43,2856.06 2695.91,2716.54 2321.9,2716.54 2283.46,2754.97 2283.46,2919.04 2321.9,2957.47 2642.51,2957.47 2691.1,3006.06 2874.65,3006.06
GND on Top Layer "NONET_L02_P-001" (solid, remove dead copper, pour order 139): 2407.87,2121.26 2382.87,2096.26 2382.87,1971.26 2407.87,1946.26 2507.87,1946.26 2532.87,1971.26 2532.87,2096.26 2507.87,2121.26
GND on Top Layer "NONET_L02_P-001" (solid, remove dead copper, pour order 138): 3367.91,1621.3 3337.87,1591.26 3188.43,1591.26 3182.87,1586.26 3182.87,1556.26 2997.87,1371.26 2357.87,1371.26 2332.87,1346.26 2332.87,1196.26 2332.87,1176.26 2332.87,1121.26 2357.87,1096.26 3382.87,1096.26 3457.87,1171.26 3457.87,1660.17 3397.84,1686.81 3397.84,1742.13 3367.91,1742.13
GND on Top Layer "NONET_L02_P-001" (solid, remove dead copper, pour order 135): 3647.87,2026.26 3742.87,1931.26 3742.87,1851.26 3762.87,1831.26 3802.87,1831.26 3822.87,1851.26 3822.87,2011.26 3767.87,2066.26 3252.87,2066.26 3242.87,2056.26 3242.87,2031.26 3247.87,2026.26 3337.87,2026.26 3367.91,1996.22 3367.91,1821.22 3372.87,1816.26 3377.87,1821.26 3416.34,1821.26 3416.34,2009.72 3432.87,2026.26
IN on Top Layer "NONET_L02_P-001" (solid, remove dead copper, pour order 134): 3237.87,1661.26 2642.87,1661.26 2472.87,1831.26 2437.87,1831.26 2332.87,1726.26 2332.87,1516.26 2352.87,1496.26 3032.87,1496.26 3167.87,1631.26 3237.87,1631.26
NetC26_2 on Top Layer "NONET_L02_P-001" (solid, remove dead copper, pour order 132): 2747.87,2131.26 2722.87,2106.26 2722.87,1956.26 2907.87,1771.26 3177.87,1771.26 3192.78,1786.16 3312.87,1786.16 3312.87,1856.24 3187.89,1856.24 3177.87,1866.26 3177.87,1921.26 2967.87,2131.26
OUT on Top Layer "NONET_L02_P-001" (solid, pour order 131): 3457.87,1836.6 3457.87,1786.26 3472.87,1786.26 3532.87,1726.26 3532.87,1166.26 3412.87,1046.26 2357.87,1046.26 2332.87,1021.26 2332.87,871.26 2357.87,846.26 3657.87,846.26 3752.87,941.26 3752.87,1651.26 3567.54,1836.6
GND on Top Layer "NONET_L02_P-001" (solid, remove dead copper, pour order 11): 1507.56,2866.06 1509.67,2868.17 1635.45,2868.17 1657.56,2846.06 1657.56,2796.06 1637.56,2776.06 1527.56,2776.06 1507.56,2796.06
GND on Top Layer "NONET_L02_P-001" (solid, remove dead copper, pour order 9): 1226.79,2825.03 1197.56,2786.06 1197.56,2706.06 1157.56,2666.06 847.56,2666.06 822.58,2641.08 314.96,2641.08 275.59,2601.71 275.59,2480.32 314.96,2440.94 1356.39,2440.94 1388.71,2473.26 1388.71,2734.92 1313.37,2810.25 1313.37,2966.06 1226.79,2966.06
OUT on Top Layer "NONET_L02_P-001" (solid, remove dead copper, pour order 7): 275.59,3070.87 275.59,3188.98 592.68,3506.06 1057.56,3506.06 1297.56,3746.06 1677.56,3746.06 1707.56,3716.06 1707.56,3596.06 1447.56,3336.06 827.56,3336.06 522.99,3031.5 320.21,3031.5
GND on Top Layer "NONET_L02_P-001" (solid, remove dead copper, pour order 6): 797.56,3196.06 797.56,3146.06 817.56,3126.06 837.56,3126.06 947.56,3016.06 1087.56,3016.06 1257.56,3186.06 1257.56,3286.06 1247.56,3296.06 887.56,3296.06
NetC1_2 on Top Layer "NONET_L02_P-001" (solid, remove dead copper, pour order 5): 1357.56,3106.06 1457.56,3206.06 1457.56,3246.06 1467.56,3256.06 1677.56,3256.06 1687.56,3246.06 1687.56,3056.06 1617.56,2986.06 1367.56,2986.06 1347.56,3006.06 1357.56,3016.06
IN on Top Layer "NONET_L02_P-001" (solid, remove dead copper, pour order 0): 872.44,3000.39 886.77,2986.06 1097.56,2986.06 1126.15,2957.47 1167.72,2957.47 1167.72,2935.82 1097.18,2935.69 1017.56,2856.06 827.56,2856.06 688.03,2716.54 314.02,2716.54 275.59,2754.97 275.59,2919.04 314.02,2957.47 634.63,2957.47 683.23,3006.06 866.77,3006.06
GND on Bottom Layer "NONET_L02_P-001" (solid, remove dead copper, pour order 156): 419.69,2311.42 230,2121.73 230,955.2 350.16,835.04 1502.36,835.04 1850,1182.68 1850,2015.2 1553.78,2311.42
GND on Bottom Layer "NONET_L02_P-001" (solid, remove dead copper, pour order 148): 2427.56,3886.22 2237.87,3696.54 2237.87,2530 2358.03,2409.84 3510.24,2409.84 3857.87,2757.48 3857.87,3590 3561.65,3886.22
GND on Bottom Layer "NONET_L02_P-001" (solid, remove dead copper, pour order 140): 2257.87,901.26 2337.87,821.26 3707.87,821.26 3857.87,971.26 3857.87,2061.26 3777.87,2141.26 2347.87,2141.26 2257.87,2051.26
GND on Bottom Layer "NONET_L02_P-001" (solid, remove dead copper, pour order 12): 419.69,3886.22 230,3696.54 230,2530 350.16,2409.84 1502.36,2409.84 1850,2757.48 1850,3590 1553.78,3886.22

## Keep-outs
Keep-Out Layer:
  lines w40: 3937.01,3858.27 ccw(c3858.27,3858.27) 3858.27,3937.01 78.74,3937.01 ccw(c78.74,3858.27) 0,3858.27 0,78.74 ccw(c78.74,78.74) 78.74,0 3858.27,0 ccw(c3858.27,78.74) 3937.01,78.74 3937.01,3858.27 ; 3937.01,3858.27 3937.01,3858.27

## Silkscreen, mask and mechanical layers (free items; w line width, h text height)
Top Overlay:
  rectangle: 2027.56,2165.35 3188.98,2322.83
  rectangle: 98.43,1771.65 393.7,2165.35
  rectangle: 1062.99,2165.35 1771.65,2322.83
  rectangle: 525,1425.2 682.48,1661.42
  rectangle: 525,1100.2 682.48,1336.42
  rectangle: 525,800.2 682.48,1036.42
  rectangle: 2106.3,3346.46 2401.57,3740.16
  rectangle: 3070.87,3740.16 3779.53,3897.64
  rectangle: 2532.87,3000 2690.35,3236.22
  rectangle: 2532.87,2675 2690.35,2911.22
  rectangle: 2532.87,2375 2690.35,2611.22
  rectangle: 2607.87,1071.26 3032.87,1271.26
  rectangle: 2607.87,821.26 3032.87,1021.26
  rectangle: 2607.87,1321.26 3032.87,1521.26
  rectangle: 2027.56,1735.67 2342.52,2204.72
  rectangle: 525,2375 682.48,2611.22
  rectangle: 525,2675 682.48,2911.22
  rectangle: 525,3000 682.48,3236.22
  rectangle: 1062.99,3740.16 1771.65,3897.64
  rectangle: 98.43,3346.46 393.7,3740.16
  lines w10: 0.77,789.23 3925.58,789.23 ; 12.2,2362.2 3937.01,2362.2 ; 1968.5,787.4 1968.5,3937.01
  lines w20: 0,2362.2 12.2,2362.2 ; 12.2,2362.2 12.2,2362.2
  text "Lout" at 525,3250 h60
  text "Lout" at 2532.87,3250 h60
  text "Hin" at 525,2925 h60
  text "Hin" at 2532.87,2925 h60
  text "COM" at 525,2625 h60
  text "COM" at 2532.87,2625 h60
  text "Lout" at 525,1675.2 h60
  text "Lin" at 2588.52,1425.74 h60 r90
  text "Hin" at 525,1350.2 h60
  text "COM" at 2588.52,1125.74 h60 r90
  text "COM" at 525,1050.2 h60
  text "Hout" at 2588.52,825.74 h60 r90
  text "+12V" at 400,550 h100
  text "+5V" at 700,550 h100
  text "GND" at 1000,550 h100
  text "-12V" at 1300,550 h100
  text "-12V" at 3489.01,451.37 h80
  text "GND" at 3488.58,349.72 h80
  text "+5V" at 3488.58,249.72 h80
  text "+12V" at 3488.58,149.72 h80
Bottom Solder:
  lines w100: 1023.62,2165.35 1496.06,2165.35 1692.91,1968.5 1692.91,1574.8 ; 1023.62,2677.17 1535.43,2677.17 1771.65,2913.39 1771.65,3503.94 ; 2401.57,1771.65 2401.57,1850.39 2401.57,1929.13 2519.68,2047.24 3110.24,2047.24 ; 2559.06,3503.94 2559.06,2677.17 2677.17,2559.06 3110.24,2559.06
Mechanical 1:
  lines w10: 78.74,-5 cw(c78.74,78.74) -5,78.74 -5,3858.27 cw(c78.74,3858.27) 78.74,3942.01 3858.27,3942.01 cw(c3858.27,3858.27) 3942.01,3858.27 3942.01,78.82 ; 78.74,-5 3858.27,-5 ; 78.74,-5 3858.27,-5 ; 3858.27,-5 ccw(c3858.27,78.74) 3942.01,78.74 ; 3942.01,78.74 ccw(c3937.01,78.74) 3942.01,78.82 ; 3942.01,78.74 ccw(c3937.01,78.74) 3942.01,78.82 ; 3942.01,78.74 3942.01,78.82